# Altium PCB PCB1.PcbDoc
Units mil, origin at the board's own origin, x right, y up, seen from the top; angles counter-clockwise.
Board outline 6000 x 4000 mil, 2 copper layers (Top Layer, Bottom Layer); 30 components, 14 nets, 63 pads, 64 vias.
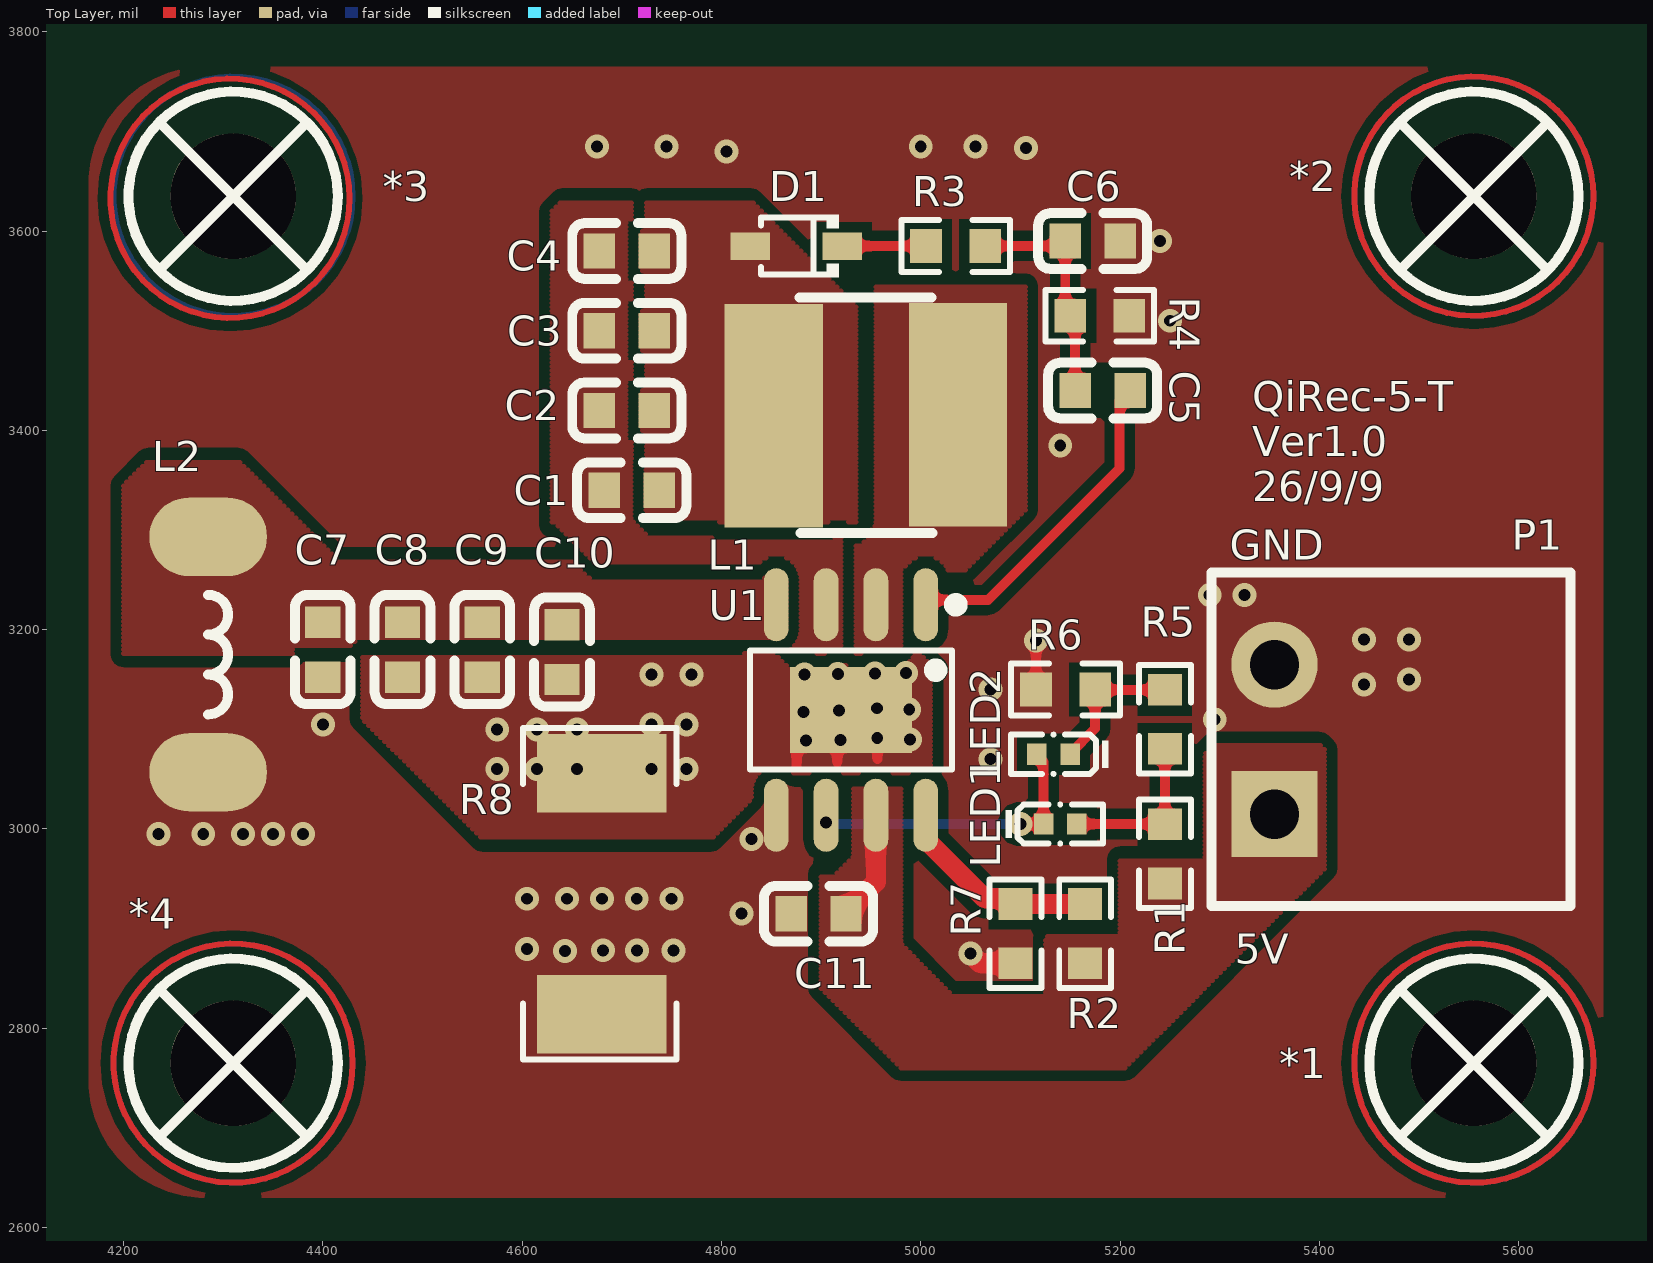
[diagram p0: Top Layer view]
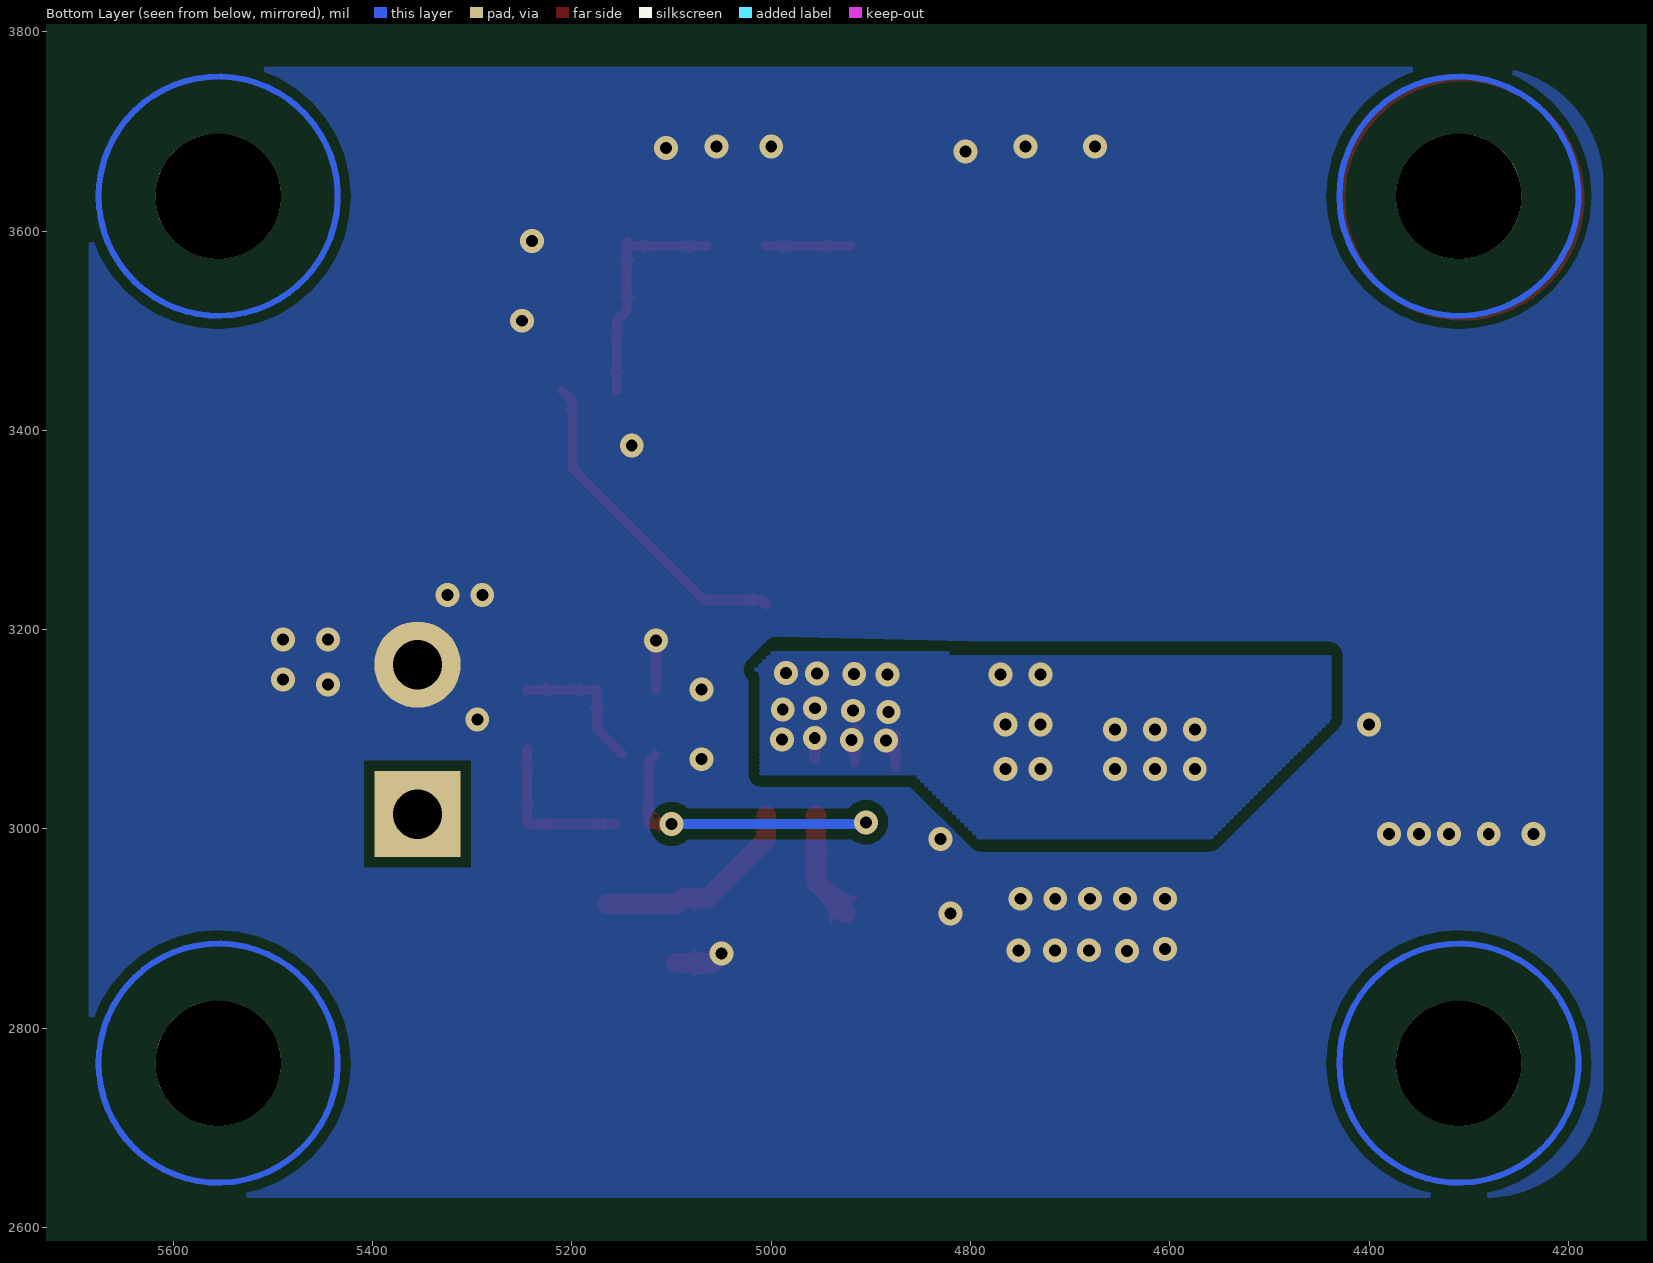
[diagram p1: Bottom Layer view, seen from below]

## Layer stack, top to bottom
Top Solder: solder mask 0.4, Solder Resist, Dk 3.5
Top Layer: signal copper 1.4
Dielectric 1: dielectric 12.6, FR-4, Dk 4.8
Bottom Layer: signal copper 1.4
Bottom Solder: solder mask 0.4, Solder Resist, Dk 3.5

## Board outline
1000,1000 7000,1000 7000,5000 1000,5000

## Design rules (kind name [scope] priority, off if disabled: settings)
Clearance [All] p1: gap=6 ignorepadtopadclearanceinfootprint=FALSE except(4: Arc-Arc Arc-Track Track-Track; 6.9: Arc-Hole Track-Hole SMDPad-Hole THPad-Hole Via-Hole Fill-Hole Poly-Hole Region-Hole Text-Hole; 10: Arc-Poly Arc-Region Track-Poly Track-Region SMDPad-Poly SMDPad-Region THPad-Poly THPad-Region Via-Poly Via-Region Fill-Poly Fill-Region Poly-Poly Poly-Region Poly-Text Region-Region Region-Text)
ComponentClearance [All] p1: gap=0 collisioncheckmode=3 verticalgap=0 showdistances=FALSE
HoleSize [All] p1: absolutevalues=TRUE maxlimit=130 minlimit=1 maxpercent=80.000 minpercent=20.000
MinimumSolderMaskSliver [All] p1: minsoldermaskwidth=4
PlaneConnect [All] p1: planeconnectstyle=Direct reliefexpansion=20 reliefentries=4 reliefconductorwidth=10 reliefairgap=10
PolygonConnect [All] p1: connectstyle=Direct reliefconductorwidth=10 reliefentries=4 polygonreliefangle="90 Angle" airgapwidth=10
RoutingVias [All] p1: holewidth=28 width=50 viastyle="Through Hole" minholewidth=28 minwidth=50 maxholewidth=28 maxwidth=50
SilkToSilkClearance [All] p1: silktosilkclearance=2
SilkToSolderMaskClearance [IsPad] p1: minsilkscreentomaskgap=0 clearancetoexposedcopper=TRUE
SolderMaskExpansion [All] p1: expansion=0 istentingtop=FALSE
SupplyNets "Schematic Supply Nets" [InNet('PGND')] p1: voltage=0.000
SupplyNets "Schematic Supply Nets_8" [InNet('GND')] p2: voltage=0.000
SupplyNets "Schematic Supply Nets_6" [InNet('VCC')] p3: voltage=0.000
Width [All] p1: maxlimit=50 minlimit=6 preferedwidth=10 minimp=50.000000 maximp=50.000000 favimp=50.000000
24 further rules are at their usual default settings.

## Components (designator, comment, footprint, x,y, rotation, side; value= is the part's Value field where it differs from the comment)
*1 "螺丝孔_1" M3螺丝 5555,2765 r0 top
*2 "螺丝孔_1" M3螺丝 5555,3635 r0 top
*3 "螺丝孔_1" M3螺丝 4310,3635 r0 top
*4 "螺丝孔_1" M3螺丝 4310,2765 r0 top
C1 "cga0603x7r104k500jt" C0603 4710,3340 r0 top value=100nF
C2 "cga0603x7r104k500jt" C0603 4705,3420 r0 top value=100nF
C3 "cga0603x7r104k500jt" C0603 4705,3500 r0 top value=100nF
C4 "cga0603x7r104k500jt" C0603 4705,3580 r0 top value=100nF
C5 "cc0603krx7r9bb153" C0603 5182.56,3440 r180 top value=15nF
C6 "cc0603krx7r9bb153" C0603 5172.56,3590 r180 top value=15nF
C7 "hgc0603r5226m160nthj" C0603 4400,3180 r90 top value=22uF
C8 "hgc0603r5226m160nthj" C0603 4480,3180 r90 top value=22uF
C9 "hgc0603r5226m160nthj" C0603 4560,3180 r90 top value=22uF
C10 "cga0603x7r104k500jt" C0603 4640,3177.56 r90 top value=100nF
C11 "hgc0603r5225k500nthj" C0603 4897.44,2915 r0 top value=2.2uF
D1 "1n5819ws_c191023" SOD-323_L1.8-W1.3-LS2.5-RD 4875,3585 r180 top
L1 "fnr6045s6r3mt" IND-SMD_L6.0-W6.0_FNR60XXS 4945,3415 r0 top value=6.3uH
L2 "10uH_1" BAT-SMD_2P-P2.54_2P-2.54PH-7.0H 4285,3175 r90 top
LED1 "xl-1005ugc_c965793" LED0402-RD_GREEN 5140,3005 r0 top
LED2 "xl-1005ugc_c965793" LED0402-RD_GREEN 5133.27,3075 r180 top
P1 "wj15edgrc-3.81-02p-14-00a" CONN-TH_2P-P3.81_WJ15EDGRC-3.81-2P 5355,3090 r90 top
R1 "0603waf1001t5e" R0603 5245,2975 r270 top value=1kΩ
R2 "hntc0603-104f4250fb" R0603 5165,2895 r270 top
R3 "frc0603f3301ts" R0603 5035,3585 r0 top value=3.3kΩ
R4 "frc0603f3302ts" R0603 5179.66,3515 r180 top value=33kΩ
R5 "frc0603f3301ts" R0603 5245,3110 r270 top value=3.3kΩ
R6 "0603waf1001t5e" R0603 5145.34,3140 r0 top value=1kΩ
R7 "frc0603f2402ts" R0603 5095,2895 r90 top value=24kΩ
R8 "re2512f3r020" RES-SMD_L6.4-W3.2-R2512 4680,2935 r90 top value=20mΩ
U1 "IP6805S_1" ESOP-8_L4.9-W3.9-P1.27-LS6.0-BL-EP3.1 4930,3119.39 r180 top

## Footprints (in the part's own frame and the unit in brackets; to place one, negate y for a bottom-side part, rotate by r counter-clockwise, add the part's x,y. Pads: shape width x height; smd on the part's side, far side on the other; paste and mask are expansions set on the pad)
BAT-SMD_2P-P2.54_2P-2.54PH-7.0H [mm]
  oval 2x3 smd paste+0 mask+0.05: 1(-3,0) 2(3,0)
  silkscreen extent -1.52,-0.51 1.52,0
C0603 [mm]
  rect 0.8x0.9 smd: 1(-0.7,0) 2(0.7,0)
  silkscreen extent -1.39,-0.71 1.39,0.71
CONN-TH_2P-P3.81_WJ15EDGRC-3.81-2P [mm]
  rect 2.2x2.2 hole 1.26: 1(-1.905,0)
  round 2.2 hole 1.26: 2(1.905,0)
  silkscreen extent -4.25,-7.55 4.25,1.6
ESOP-8_L4.9-W3.9-P1.27-LS6.0-BL-EP3.1 [mm]
  oval 0.63x1.865 smd: 1(-1.905,-2.682) 2(-0.635,-2.682) 3(0.635,-2.682) 4(1.905,-2.682) 5(1.905,2.682) 6(0.635,2.682) 7(-0.635,2.682) 8(-1.905,2.682)
  rect 3.1x2.2 smd paste+0 mask+0.05: 9(0,0)
  silkscreen extent -2.82,-2.83 2.58,1.52
IND-SMD_L6.0-W6.0_FNR60XXS [mm]
  rect 2.5x5.7 smd: 1(-2.35,-0.013) 2(2.35,0.013)
  silkscreen extent -1.69,-3 1.69,3
LED0402-RD_GREEN [mm]
  rect 0.5x0.54 smd paste+0 mask+0.051: 1(-0.425,0) 2(0.425,0)
  silkscreen extent -1.39,-0.54 1.09,0.54
M3螺丝 [mil]
  round 126 hole 126 paste-99999 mask+4: 1(0,0)
  silkscreen extent -105,-105 105,105
R0603 [mil]
  rect 31.75x34.02 smd paste-3937.01 mask+2: 1(-29.66,0) 2(29.66,0)
  silkscreen extent -55,-26 55,26
RES-SMD_L6.4-W3.2-R2512 [mm]
  rect 2x3.3 smd: 1(-3.066,0) 2(3.066,0)
  silkscreen extent -4.23,-1.91 4.23,2.01
SOD-323_L1.8-W1.3-LS2.5-RD [mm]
  rect 1x0.7 smd: 1(-1.172,0) 2(1.172,0)
  silkscreen extent -1.08,-0.8 0.9,0.8

## Part data
C1 C2 C3 C4 C10: "容值:100nF;精度:±10%;额定电压:50V;温度系数:X7R;", JLCPCB Part Class="Extended Part", LCSC Part Name="100nF ±10% 50V", Manufacturer=HRE(芯声), ManufacturerPart=CGA0603X7R104K500JT, Temperature Coefficient=X7R, Tolerance=±10%, Voltage Rating=50V, AddInBom=yes, ConvertToPcb=yes, Datasheet=https://item.szlcsc.com/datasheet/CGA0603X7R104K500JT/7062573.html, FootprintName=C0603, ModelId=ac125912035d415993ca9572d50418b1, ModelName=C0603_L1.6-W0.8-H0.8, ModelTransform=62.992,31.496,0,0,0,0,0,0,0, Supplier=LCSC, Supplier Footprint=0603, SupplierPart=C6119867, Symbol=CGA0603X7R104K500JT
C5 C6: "容值:15nF;精度:±10%;额定电压:50V;材质(温度系数):X7R;", JLCPCB Part Class="Extended Part", LCSC Part Name="15nF ±10% 50V", Manufacturer=YAGEO(国巨), ManufacturerPart=CC0603KRX7R9BB153, Temperature Coefficient=X7R, Tolerance=±10%, Voltage Rated=50V, AddInBom=yes, ConvertToPcb=yes, Datasheet=https://atta.szlcsc.com/upload/public/pdf/source/20180910/C282072_33301C7F631E79921B82A8DAC6BCC5B3.pdf, FootprintName=C0603, ModelId=ac125912035d415993ca9572d50418b1, ModelName=C0603_L1.6-W0.8-H0.8, ModelTransform=62.992,31.496,0,0,0,0,0,0,0, Supplier=LCSC, Supplier Footprint=0603, SupplierPart=C107076, Symbol=CC0603KRX7R9BB153
C7 C8 C9: "容值:22uF;精度:±20%;额定电压:16V;温度系数:X5R;", JLCPCB Part Class="Extended Part", LCSC Part Name="22uF ±20% 16V", Manufacturer=Chinocera(华瓷), ManufacturerPart=HGC0603R5226M160NTHJ, Temperature Coefficient=X5R, Tolerance=±20%, Voltage Rating=16V, AddInBom=yes, ConvertToPcb=yes, Datasheet=https://item.szlcsc.com/datasheet/HGC0603R5226M160NTHJ/23841133.html, FootprintName=C0603, ModelId=ac125912035d415993ca9572d50418b1, ModelName=C0603_L1.6-W0.8-H0.8, ModelTransform=62.992,31.496,0,0,0,0,0,0,0, Supplier=LCSC, Supplier Footprint=0603, SupplierPart=C22367828, Symbol=HGC0603R5226M160NTHJ
C11: "容值:2.2uF;精度:±10%;额定电压:50V;温度系数:X5R;", JLCPCB Part Class="Extended Part", LCSC Part Name="2.2uF ±10% 50V", Manufacturer=Chinocera(华瓷), ManufacturerPart=HGC0603R5225K500NTHJ, Temperature Coefficient=X5R, Tolerance=±10%, Voltage Rating=50V, AddInBom=yes, ConvertToPcb=yes, Datasheet=https://item.szlcsc.com/datasheet/HGC0603R5225K500NTHJ/8438251.html, FootprintName=C0603, ModelId=ac125912035d415993ca9572d50418b1, ModelName=C0603_L1.6-W0.8-H0.8, ModelTransform=62.992,31.496,0,0,0,0,0,0,0, Supplier=LCSC, Supplier Footprint=0603, SupplierPart=C7432769, Symbol=HGC0603R5225K500NTHJ
D1: "正向压降(Vf):600mV@1A;直流反向耐压(Vr):40V;整流电流:1A;", Current - Rectified=1A, JLCPCB Part Class="Basic Part", LCSC Part Name="电压:40V 电流:1A", Manufacturer=Hottech(合科泰), ManufacturerPart=1N5819WS, Non-Repetitive Peak Forward Surge Current=25A, Voltage - DC Reverse(Vr)=40V, Voltage - Forward(Vf@If)=600mV@1A, AddInBom=yes, ConvertToPcb=yes, Datasheet=https://item.szlcsc.com/datasheet/1N5819WS/213850.html, FootprintName=SOD-323_L1.8-W1.3-LS2.5-RD, ModelId=db63db13d9e342eb939127d413d6200b, ModelName=SOD-323_L1.8-W1.3-LS2.5-RD, ModelTransform=104.3305,51.181,0,0,0,0,0,-0.004,0, Supplier=LCSC, Supplier Footprint=SOD-323, SupplierPart=C191023, Symbol=1N5819WS
L1: "电感值:6.3uH;精度:±20%;额定电流:3.3A;饱和电流(Isat):4.7A;类型:磁胶屏蔽绕线合金电感;", Current - Saturation(Isat)=4.7A, Current Rating=3.3A, DC Resistance(DCR)=40mΩ, JLCPCB Part Class="Extended Part", LCSC Part Name="6.3uH ±20% 4.7A", Manufacturer=cjiang(长江微电), ManufacturerPart=FNR6045S6R3MT, Tolerance=±20%, AddInBom=yes, ConvertToPcb=yes, Datasheet=https://atta.szlcsc.com/upload/public/pdf/source/20190327/C167925_9EFF0AABC4CA629C2CC95961DBF7D39D.pdf, FootprintName=IND-SMD_L6.0-W6.0_FNR60XXS, ModelId=a3b1a14981914683918d1fd1319c5d5c, ModelName=IND-SMD_L6.0-W6.0-H2.8, ModelTransform=236.22,237.007,0,90,0,0,0,0,0, Supplier=LCSC, Supplier Footprint=SMD,6x6mm, SupplierPart=C168071, Symbol=FNR6045S6R3MT, Type=磁胶屏蔽绕线合金电感
LED1 LED2: "灯头类型:1.0mmx0.5mm方形灯头;发光颜色:翠绿色;正向压降(Vf):3V;功率:80mW;正向电流:25mA;波长:516nm~531nm;二极管配置:独立二极管;透镜颜色:无色透明透镜;色温:-;发光强度:249mcd;发光角度:120°;载带方式:正贴;工作温度:-40℃~+85℃;", Color Temperature=-, Forward Current=25mA, Illumination Color=翠绿色, JLCPCB Part Class="Extended Part", LCSC Part Name=0402翠绿贴片式发光二极管, Lens Color=无色透明透镜, Manufacturer=XINGLIGHT(成兴光), ManufacturerPart=XL-1005UGC, Operating Temperature=-40℃~+85℃, Power(Watts)=80mW, Voltage - Forward(Vf)=3V, AddInBom=yes, ConvertToPcb=yes, Datasheet=https://item.szlcsc.com/datasheet/XL-1005UGC/1051402.html, Diode Configuration=独立二极管, FootprintName=LED0402-RD_GREEN, Lamp Holder Type=1.0mmx0.5mm方形灯头, Luminous Intensity=249mcd, ModelId=080bb9bd520f4b34ac21e218e7b036d6, ModelName=LED0402_L1.0-W0.5-H0.2, ModelTransform=40.1574,19.685,0,0,0,0,0,-0.0005,0, Mounting Style=正贴, Peak Wavelength=531nm, Supplier=LCSC, Supplier Footprint=0402, SupplierPart=C965793, Symbol=XL-1005UGC, Viewing Angle=120°, Wavelength - Dominant=516nm~531nm
P1: "连接器类型:板端/插座-闭口;固定方式:无固定装置;结构:1x2P;间距:3.81mm;颜色:绿色;安装方式:弯插;排数:1;每排PIN数:2;额定电流:8A;额定电压:300V;线规 - AWG:-;线规 - 平方毫米:-;工作温度:-40℃~+105℃;", Color=绿色, Current Rating=8A, JLCPCB Part Class="Extended Part", LCSC Part Name="无固定装置 1x2P 3.81mm 排数:1 每排P数:2", Manufacturer=KANGNEX(康奈克斯电气), ManufacturerPart=WJ15EDGRC-3.81-02P-14-00A, Operating Temperature=-40℃~+105℃, Voltage Rating (Max)=300V, AddInBom=yes, Connection Type=-, Connector Type=板端/插座-闭口, ConvertToPcb=yes, Datasheet=https://item.szlcsc.com/datasheet/WJ15EDGRC-3.81-02P-14-00A/8881.html, FootprintName=CONN-TH_2P-P3.81_WJ15EDGRC-3.81-2P, ModelId=816ec8aca6fe4785be70cb4c5121258d, ModelName=CONN-TH_2P_L8.5-W9.2-H7.0-P3.81, ModelTransform=334.645,360.2355,0,0,0,0,0,-118.11,-137.795, Mounting Type=弯插, Number of Pins=2P, Number of PINs Per Row=2, Number of Positions or Pins=1x2P, Number of Rows=1, Outlet Direction (Vertical Basis)=-, Pitch=3.81mm, Supplier=LCSC, Supplier Footprint=弯插,P=3.81mm, SupplierPart=C8387, Symbol=WJ15EDGRC-3.81-2P, Termination Style=无固定装置, Wire Gauge - AWG=-, Wire Gauge - mm2=-
R1 R6: "电阻类型:厚膜电阻;阻值:1kΩ;精度:±1%;功率:100mW;工作电压:75V;温度系数:±100ppm/℃;", JLCPCB Part Class="Basic Part", LCSC Part Name="1kΩ ±1% 100mW 厚膜电阻", Manufacturer=UNI-ROYAL(厚声), ManufacturerPart=0603WAF1001T5E, Operating Temperature=-55℃~+155℃, Power(Watts)=100mW, Temperature Coefficient=±100ppm/℃, Tolerance=±1%, Voltage-Supply(Max)=75V, AddInBom=yes, ConvertToPcb=yes, Datasheet=https://item.szlcsc.com/datasheet/0603WAF1001T5E/21904.html, FootprintName=R0603, ModelId=fc143cca1e79419f9cd78b61e9279f08, ModelName=R0603, ModelTransform=31.8897,63.7794,0,90,0,0,0,0,0, Supplier=LCSC, Supplier Footprint=0603, SupplierPart=C21190, Symbol=0603WAF1001T5E, Type=厚膜电阻
R2: "功率:100mW;阻值:100kΩ;电阻精度:±1%;B值精度:±1%;B值(25℃/50℃):4250K;最大稳态电流(25℃):10uA;", B Constant Tolerance=±1%, JLCPCB Part Class="Extended Part", LCSC Part Name=贴片NTC热敏电阻, Manufacturer=R+O(宏嘉诚), ManufacturerPart=HNTC0603-104F4250FB, Operating Temperature=-40℃~+125℃, Power(Watts)=100mW, Resistance @ 25℃=100kΩ, Steady State Current (Max)=10uA, AddInBom=yes, B Constant (25℃/50℃)=4250K, B Constant (25℃/75℃)=-, B Constant (25℃/85℃)=-, B Constant (25℃/100℃)=-, ConvertToPcb=yes, Datasheet=https://item.szlcsc.com/datasheet/HNTC0603-104F4250FB/51678332.html, Diameter (φD)=-, Dissipation Factor=1mW/℃, FootprintName=R0603, Height=0.8mm, Length=1.6mm, ModelId=fc143cca1e79419f9cd78b61e9279f08, ModelName=R0603, ModelTransform=31.8897,63.7794,0,90,0,0,0,0,0, Pitch=0.3mm, Resistance Tolerance=±1%, Supplier=LCSC, Supplier Footprint=0603, SupplierPart=C49247679, Symbol=HNTC0603-104F4250FB, Thermal Time Constant=5s, Width=0.8mm
R3 R5: "电阻类型:厚膜电阻;阻值:3.3kΩ;精度:±1%;功率:100mW;工作电压:75V;温度系数:±100ppm/℃;", JLCPCB Part Class="Extended Part", LCSC Part Name="3.3kΩ ±1% 100mW 厚膜电阻", Manufacturer=FOJAN(富捷), ManufacturerPart=FRC0603F3301TS, Operating Temperature=-55℃~+155℃, Power(Watts)=100mW, Temperature Coefficient=±100ppm/℃, Tolerance=±1%, Voltage-Supply(Max)=75V, AddInBom=yes, ConvertToPcb=yes, Datasheet=https://item.szlcsc.com/datasheet/FRC0603F3301TS/3180536.html, FootprintName=R0603, ModelId=fc143cca1e79419f9cd78b61e9279f08, ModelName=R0603, ModelTransform=31.8897,63.7794,0,90,0,0,0,0,0, Supplier=LCSC, Supplier Footprint=0603, SupplierPart=C2907023, Symbol=FRC0603F3301TS, Type=厚膜电阻
R4: "电阻类型:厚膜电阻;阻值:33kΩ;精度:±1%;功率:100mW;工作电压:75V;温度系数:±100ppm/℃;", JLCPCB Part Class="Extended Part", LCSC Part Name="33kΩ ±1% 100mW 厚膜电阻", Manufacturer=FOJAN(富捷), ManufacturerPart=FRC0603F3302TS, Operating Temperature=-55℃~+155℃, Power(Watts)=100mW, Temperature Coefficient=±100ppm/℃, Tolerance=±1%, Voltage-Supply(Max)=75V, AddInBom=yes, ConvertToPcb=yes, FootprintName=R0603, ModelId=fc143cca1e79419f9cd78b61e9279f08, ModelName=R0603, ModelTransform=31.8897,63.7794,0,90,0,0,0,0,0, Supplier=LCSC, Supplier Footprint=0603, SupplierPart=C2907028, Symbol=FRC0603F3302TS, Type=厚膜电阻
R7: "电阻类型:厚膜电阻;阻值:24kΩ;精度:±1%;功率:100mW;工作电压:75V;温度系数:±100ppm/℃;", JLCPCB Part Class="Extended Part", LCSC Part Name="24kΩ ±1% 100mW 厚膜电阻", Manufacturer=FOJAN(富捷), ManufacturerPart=FRC0603F2402TS, Operating Temperature=-55℃~+155℃, Power(Watts)=100mW, Temperature Coefficient=±100ppm/℃, Tolerance=±1%, Voltage-Supply(Max)=75V, AddInBom=yes, ConvertToPcb=yes, FootprintName=R0603, ModelId=fc143cca1e79419f9cd78b61e9279f08, ModelName=R0603, ModelTransform=31.8897,63.7794,0,90,0,0,0,0,0, Supplier=LCSC, Supplier Footprint=0603, SupplierPart=C2930081, Symbol=FRC0603F2402TS, Type=厚膜电阻
R8: "电阻类型:采样电阻；合金电阻;阻值:20mΩ;精度:±1%;功率:3W;温度系数:±50ppm/℃;安装方式:贴片;", JLCPCB Part Class="Extended Part", LCSC Part Name="20mΩ 3W 2512 ±1%", Manufacturer=JIERR(捷而瑞), ManufacturerPart=RE2512F3R020, Power(Watts)=3W, Temperature Coefficient=±50ppm/℃, Tolerance=±1%, AddInBom=yes, ConvertToPcb=yes, Datasheet=https://item.szlcsc.com/datasheet/RE2512F3R020/49133294.html, FootprintName=RES-SMD_L6.4-W3.2-R2512, ModelId=3c946b39f1b547de9af067cb1ede82cc, ModelName=RES-SMD_L6.4-W3.2-R2512, ModelTransform=252.7554,126.7714,0,0,0,0,0,0,0, Mounting Type=贴片, Supplier=LCSC, Supplier Footprint=2512, SupplierPart=C46961755, Symbol=RE2512F3R020, Type=采样电阻；合金电阻
L2: Symbol=10uH
U1: Symbol=IP6805S

## Via types
v1: diameter 24, hole 12, Top Layer to Bottom Layer, tented both sides, 64 vias

## Nets (pads, with @x,y where several pads share a name; then routed paths per layer and width w, separated by ;. In a path a pad name is that pad's centre, name@x,y a point inside that pad or via, vN(x,y) a via of type N, cw(c..) or ccw(c..) an arc to the next point about the centre after c; other vN are vias at no path point)
GND: C6.1 C7.1 C11.1 L2.1 P1.2 R4.1 R6.1 R7.1 R8.1 U1.5 | length 99.3
  Top Layer w10: v1@5115,3190 v1(5115.68,3189.32) R6.1
  Top Layer w20: v1(5050,2875) 5059.66,2865.34 R7.1
  other v1: 4642.98,2877.55 4681.3,2878.28 4715.23,2877.92 4751.71,2877.92 4604.67,2879.37 4820,2915 4605,2930 4645,2930 4680,2930 4715,2930 4750,2930 4830,2990 4235,2995 4280,2995 4320,2995 4350,2995 4380,2995 5070,3070 4400,3105 5295,3110 5070,3140 5445,3145 5490,3150 5445,3190 5490,3190 5290,3235 5325,3235 5140,3385 5250,3510 5240,3590 4805,3680 5105.76,3683.52 4675,3685 4745,3685 5000,3685 5055,3685
LED: LED1.1 LED2.2 U1.6 | length 292.7
  Top Layer w10: v1(5100,3005) LED1.1 5123.27,3067.48 5116.53,3074.22 LED2.2
  Bottom Layer w10: v1@4903.46,3004.24 4904.09,3004.88 v1@5099.88,3004.88
  other v1: 4905.06,3006.71
NetC1_1: C1.1 C2.1 C3.1 C4.1 U1.3
NetC1_2: C1.2 C2.2 C3.2 C4.2 D1.2 L1.1
NetC5_2: C5.2 C6.2 R3.2 R4.2 | length 236.6
  Top Layer w10: R3.2 5140,3585 C6.2 5145,3520 R4.2 5155,3510 C5.2
NetC7_2: C7.2 C8.2 C9.2 C10.2 L2.2 U1.4
NetD1_1: D1.1 R3.1 | length 81.7
  Top Layer w10: D1.1 D1.1@4923.66,3585 ; D1.1@4926.16,3585 R3.1
NetL1_2: L1.2 U1.2
NetLED1_2: LED1.2 R1.1 R5.2 | length 163.4
  Top Layer w10: LED1.2 5244.66,3005 5245,3005.34 R5.2
NetLED2_1: LED2.1 R5.1 R6.2 | length 145.5
  Top Layer w10: LED2.1 5150,3075.79 5175,3100.79 R6.2 5175.34,3139.66 R5.1
NTC: R2.1 R7.2 U1.8 | length 211.2
  Top Layer w20: U1.8 5005,2989.47 5063.93,2930.54 5089.12,2930.54 R7.2 R2.1
PGND: C8.1 C9.1 C10.1 R8.2 U1.9 | length 97
  Top Layer w10: U1.9@4875,3095 4875.84,3094.16 4875.39,3093.7 4875.39,3062.43 ; U1.9@4915,3100 4916.23,3098.77 4916.23,3066.89 ; U1.9@4955,3100 4956.57,3098.43 4956.57,3070.34
  other v1: 4575,3060 4615,3060 4655,3060 4730,3060 4765,3060 4884.65,3088.78 4919.26,3089.33 4989.03,3089.88 4956.36,3091.27 4575,3100 4615,3100 4655,3100 4730,3105 4765,3105 4882.44,3117.57 4917.88,3118.68 4988.47,3119.78 4956.08,3121.17 4730,3155 4770,3155 4883.55,3154.82 4916.76,3155.6 4954.16,3156.06 4985.1,3156.4
VCC: C11.2 P1.1 R1.2 R2.2 U1.7 | length 111.2
  Top Layer w20: C11.2 4925,2916.97 4955,2946.97 U1.7
VDEM: C5.1 U1.1 | length 333.7
  Top Layer w10: U1.1 5009.92,3229.92 5067.43,3229.92 5199.37,3361.86 5199.37,3429.25 C5.1
pads on no net: *1.1 *2.1 *3.1 *4.1
copper on no net: | length 6031.9
  Top Layer w5.98: 4426.88,3632.92 ccw(c4306.88,3632.92) 4426.88,3632.92 ; 4430,2765 ccw(c4310,2765) 4430,2765 ; 5675,2765 ccw(c5555,2765) 5675,2765 ; 5675,3635 ccw(c5555,3635) 5675,3635
  Bottom Layer w5.98: 4430,2765 ccw(c4310,2765) 4430,2765 ; 4430,3635 ccw(c4310,3635) 4430,3635 ; 5675,2765 ccw(c5555,2765) 5675,2765 ; 5675,3635 ccw(c5555,3635) 5675,3635

## Polygon pours and split planes (outlines as drawn)
GND on Top Layer "NONET_L-01_P-001" (solid, remove dead copper, pour order 8): 4165,2748.11 4165,3646.89 cw(c4283.11,3646.89) 4283.11,3765 5566.89,3765 cw(c5566.89,3646.89) 5685,3646.89 5685,2748.11 cw(c5566.89,2748.11) 5566.89,2630 4283.11,2630 cw(c4283.11,2748.11)
NetC7_2 on Top Layer "NONET_L-01_P-001" (hatched Horizontal grid 4 track 5, remove dead copper, pour order 7): 4870,3265 4865,3270 4415,3270 4315,3370 4225,3370 4200,3345 4200,3175 4435,3175 4445,3185 4865,3185 4870,3180
VCC on Top Layer "NONET_L-01_P-001" (hatched Horizontal grid 4 track 5, remove dead copper, pour order 6): 5295,3085 5285,3075 5285,2970 5200,2970 5200,2895 5130,2895 5125,2890 5125,2835 5030,2835 4980,2885 4980,3045 4970,3055 4932.5,3055 4932.5,2972.5 4915,2955 4900,2955 4900,2840 4980,2760 5205,2760 5405,2960 5405,3080 5400,3085
PGND on Top Layer "NONET_L-01_P-001" (hatched Horizontal grid 4 track 5, remove dead copper, pour order 4): 4440,3175 4440,3110 4560,2990 4790,2990 4855,3055 5010,3055 5010,3155 5015,3160 4995,3180 4780,3175
NetL1_2 on Top Layer "NONET_L-01_P-001" (hatched Horizontal grid 4 track 5, remove dead copper, pour order 2): 4955,3545 4955,3305 4930,3280 4935,3275 4935,3175 4980,3175 4980,3260 5045,3260 5105,3320 5105,3545
NetC1_2 on Top Layer "NONET_L-01_P-001" (hatched Horizontal grid 4 track 5, remove dead copper, pour order 1): 4710,3630 4715,3625 4715,3300.49 4935,3300.49 4935,3525 4830,3630
NetC1_1 on Top Layer "NONET_L-01_P-001" (hatched Horizontal grid 4 track 5, remove dead copper, pour order 0): 4915,3175 4920,3180 4920,3295 4725,3295 4710,3310 4710,3630 4640,3630 4630,3620 4630,3305 4635,3305 4675,3265 4870,3265 4870,3180 4875,3175
GND on Bottom Layer "NONET_L-01_P-001" (solid, remove dead copper, pour order 9): 4165,2748.11 4165,3646.89 cw(c4283.11,3646.89) 4283.11,3765 5566.89,3765 cw(c5566.89,3646.89) 5685,3646.89 5685,2748.11 cw(c5566.89,2748.11) 5566.89,2630 4283.11,2630 cw(c4283.11,2748.11)
PGND on Bottom Layer "NONET_L-01_P-001" (hatched Horizontal grid 4 track 5, remove dead copper, pour order 3): 4440,3175 4440,3110 4560,2990 4790,2990 4855,3055 5010,3055 5010,3155 5015,3160 4995,3180 4780,3175

## Silkscreen, mask and mechanical layers (free items; w line width, h text height)
Top Overlay:
  text "QiRec-5-T / Ver1.0 / 26/9/9" at 5332.64,3329.01 h30
  text "GND" at 5310,3270 h30
  text "5V" at 5315,2865 h30
Mechanical 1:
  lines w10: 4165,2748.11 ccw(c4283.11,2748.11) 4283.11,2630 5566.89,2630 ccw(c5566.89,2748.11) 5685,2748.11 5685,3646.89 ccw(c5566.89,3646.89) 5566.89,3765 4283.11,3765 ccw(c4283.11,3646.89) 4165,3646.89 4165,2748.11